# Altium PCB PiggySat-antenna.PcbDoc
Units mil, origin at the board's own origin, x right, y up, seen from the top; angles counter-clockwise.
Board outline 2047.24 x 2047.24 mil, 4 copper layers (Top Layer, Mid Layer 1, Mid Layer 2, Bottom Layer), stack 62.45 mil thick; 30 components, 19 nets, 94 pads, 965 vias.
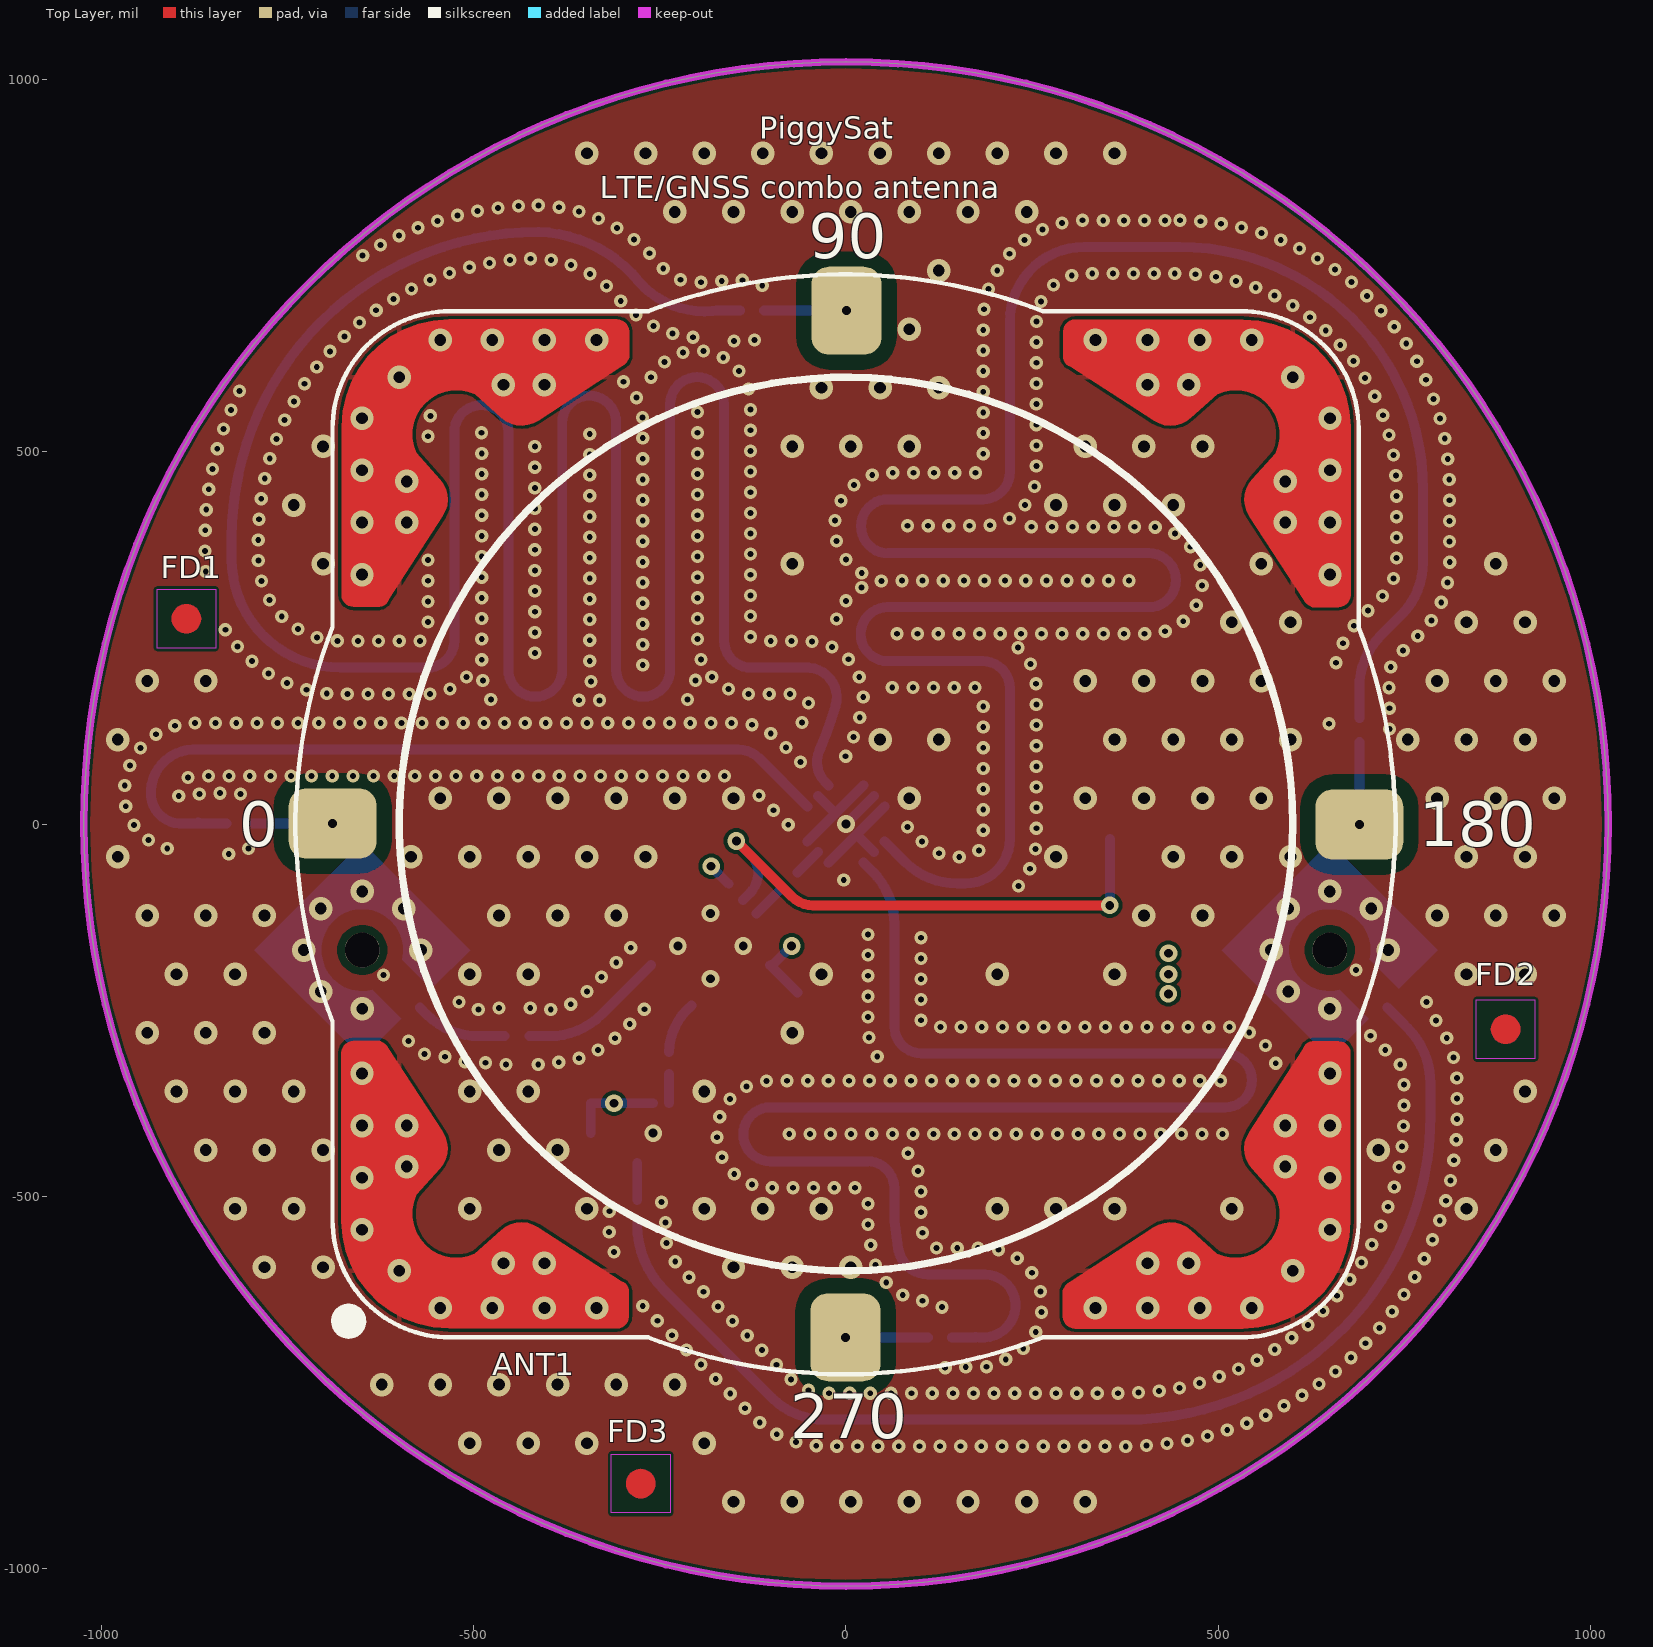
[diagram p0: Top Layer view]
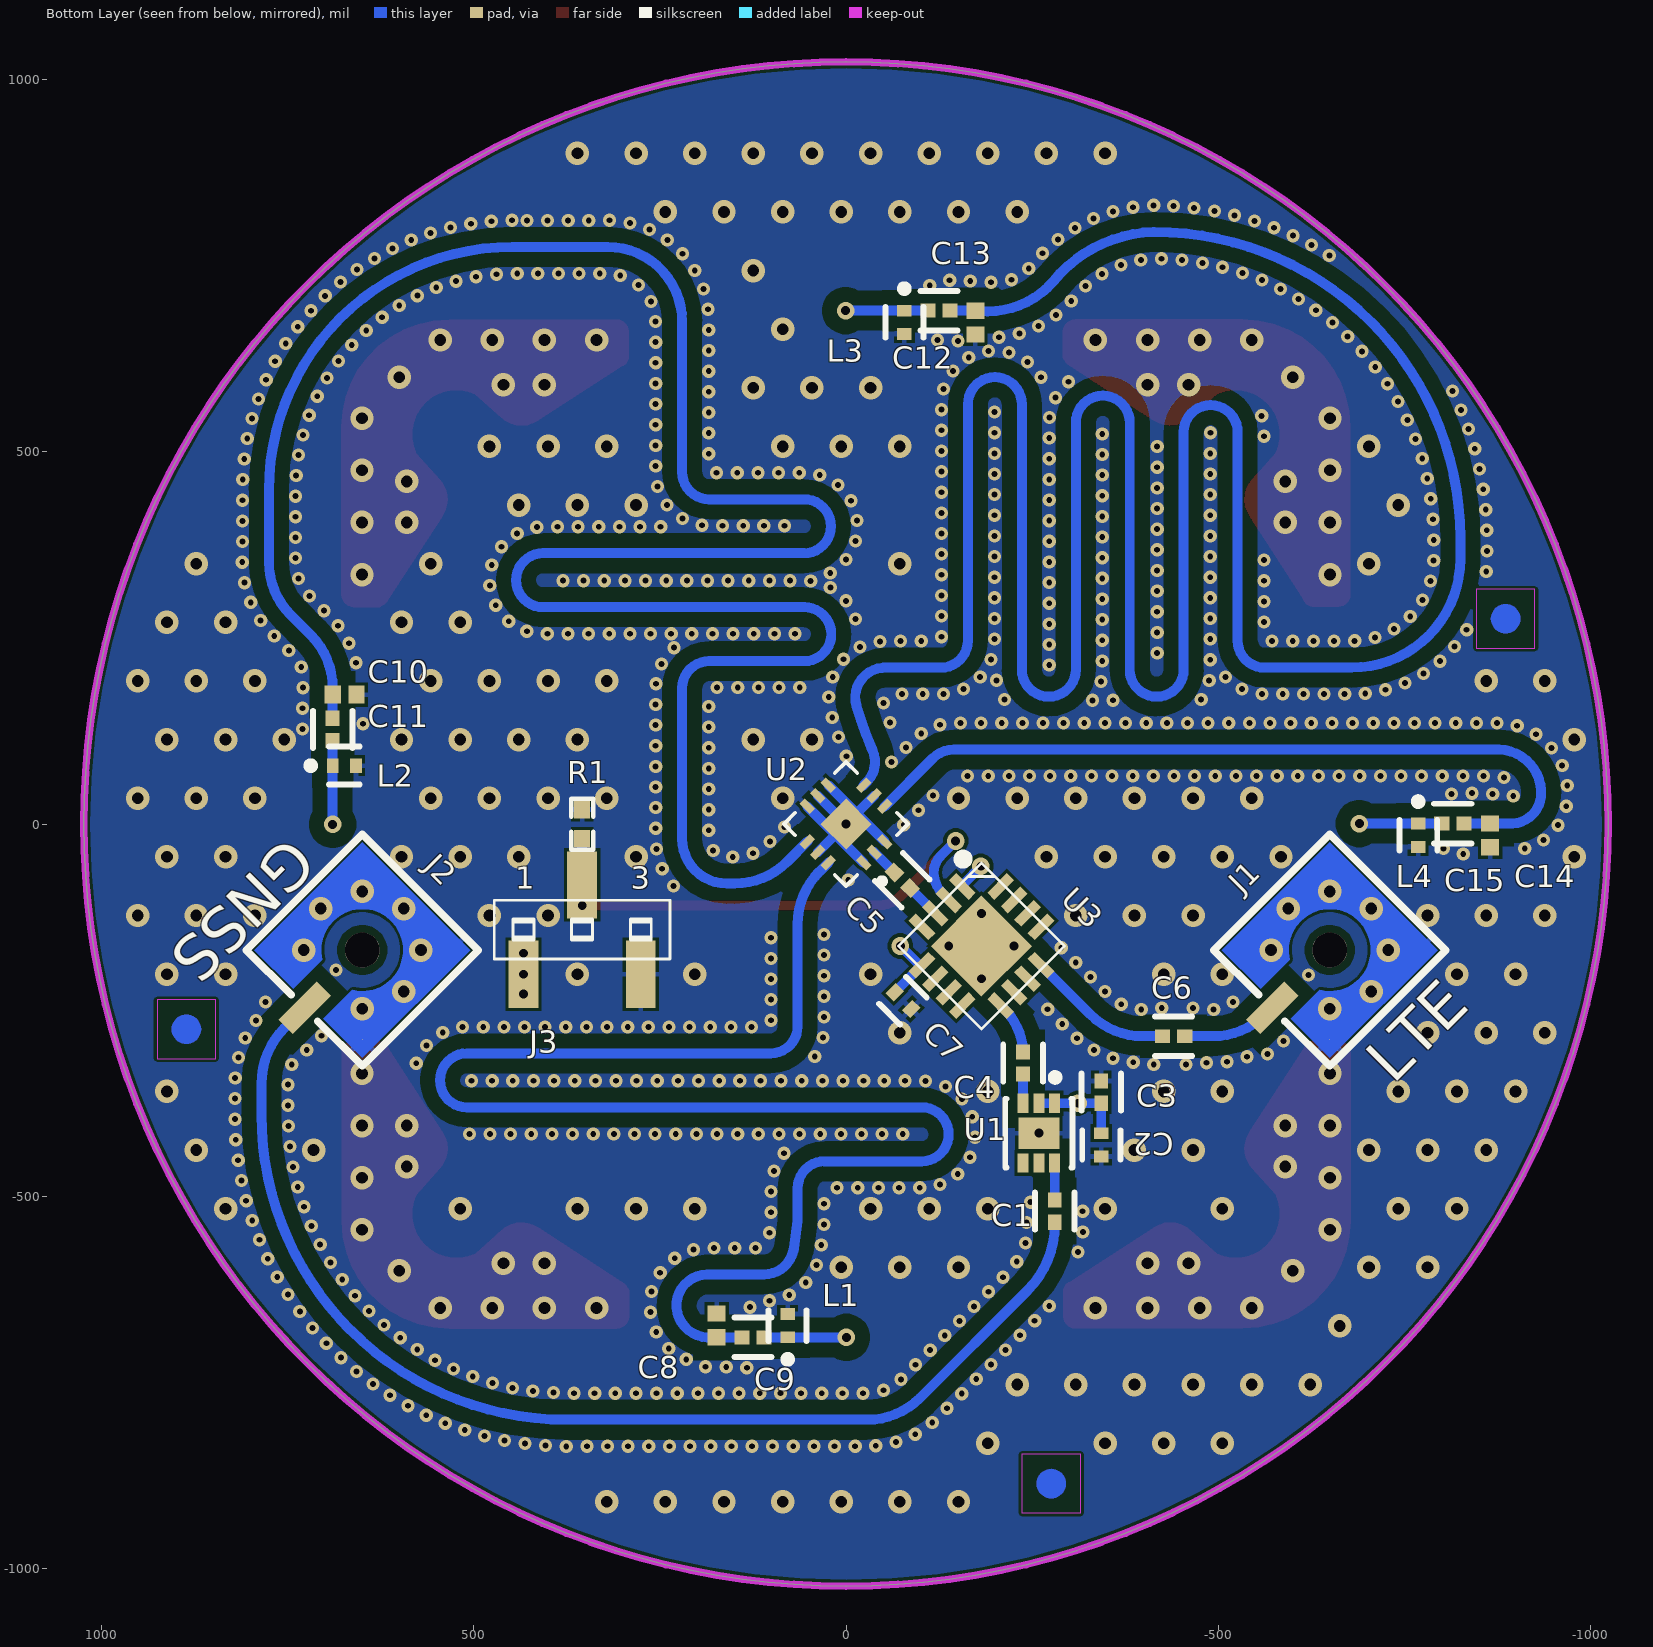
[diagram p1: Bottom Layer view, seen from below]
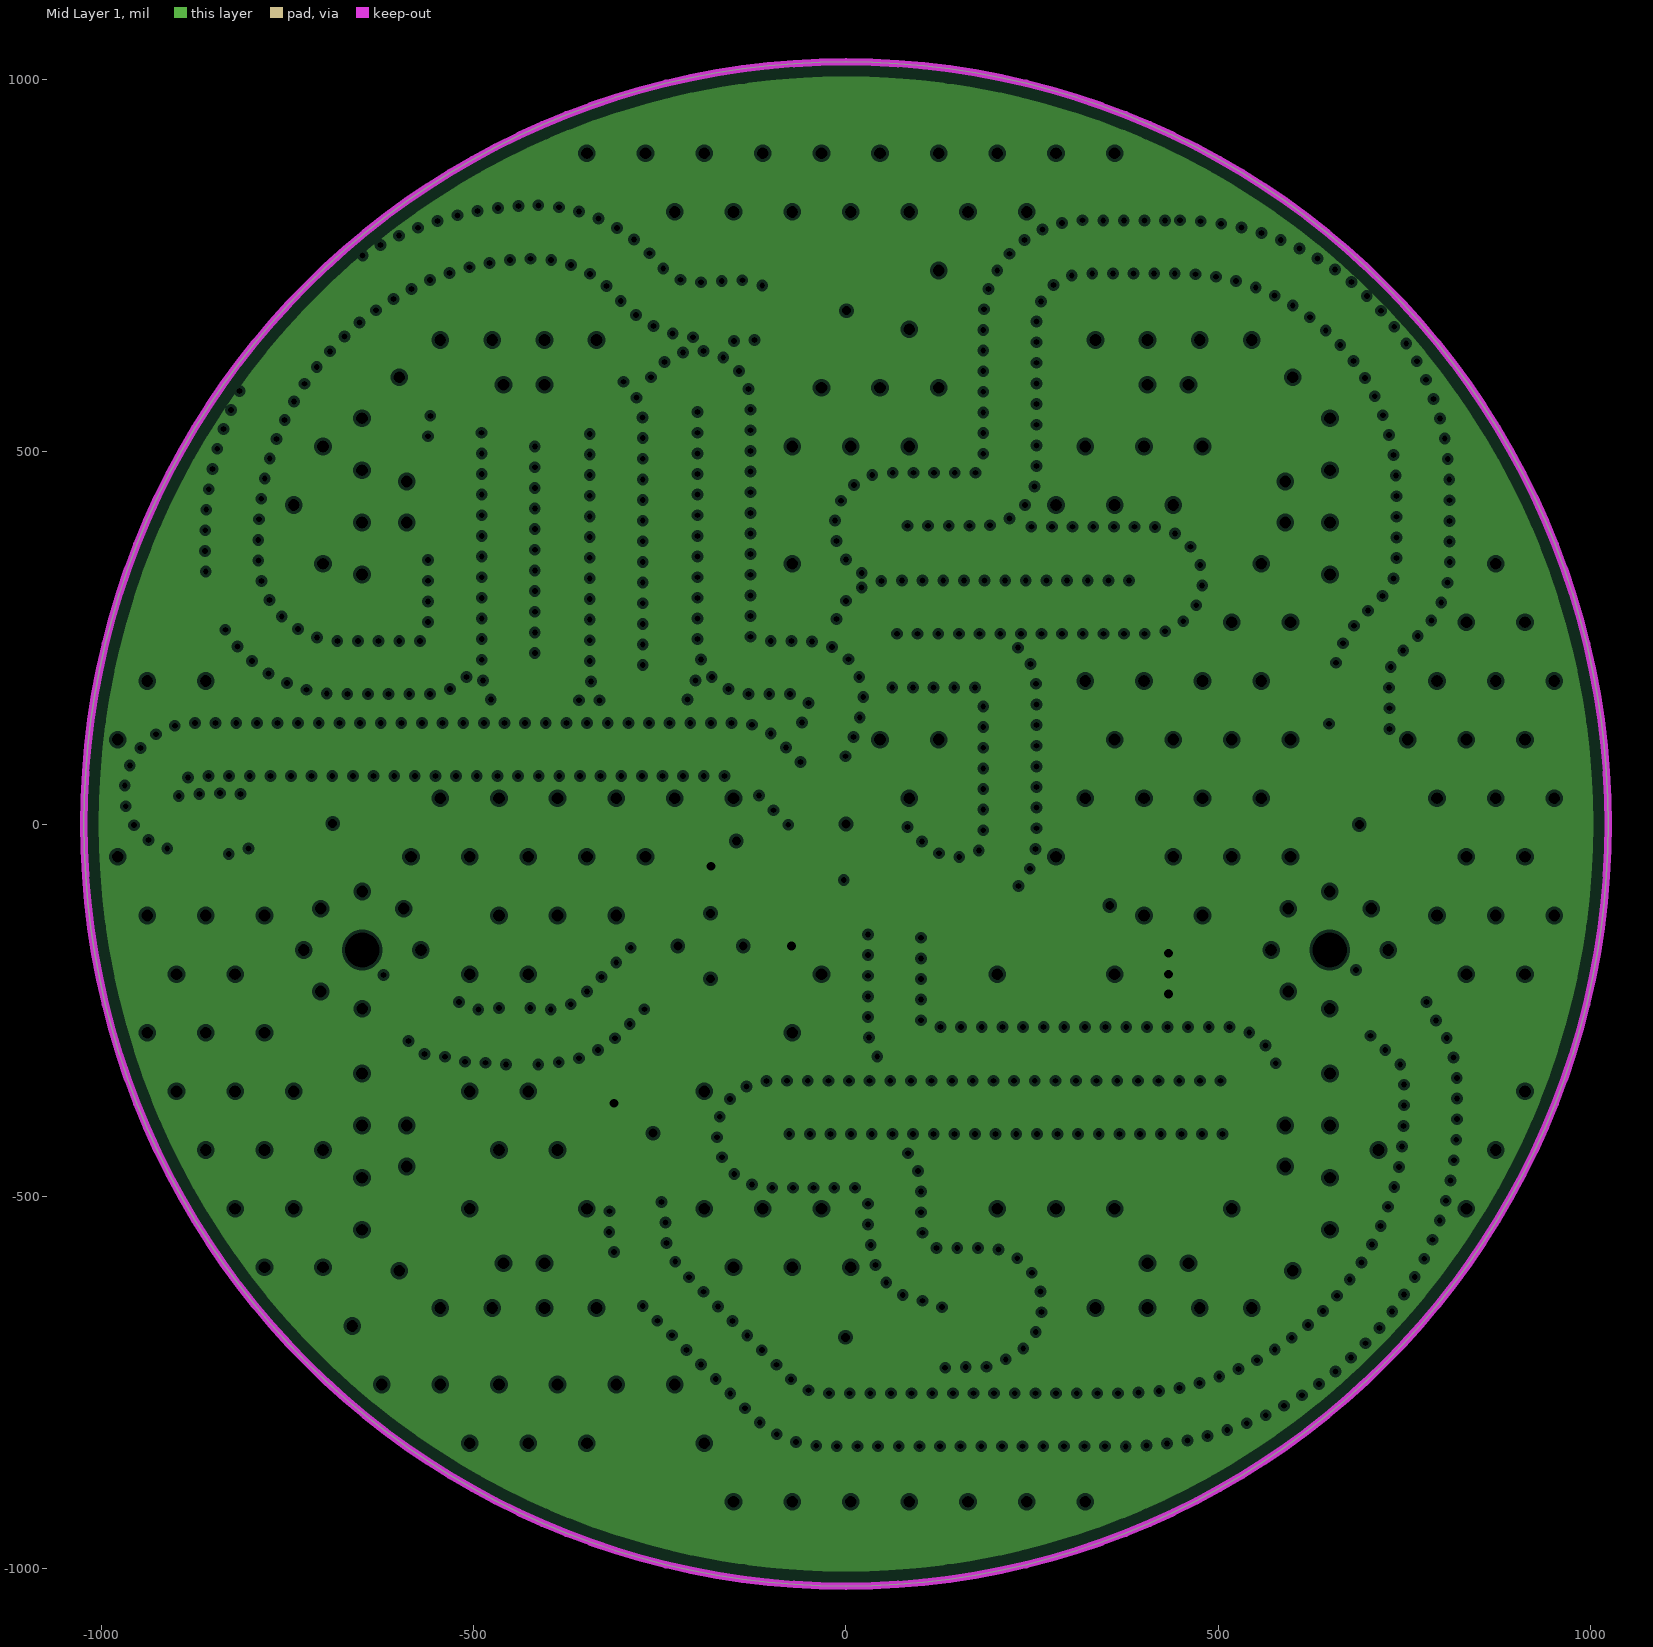
[diagram p2: Mid Layer 1, clearances drawn from the general rule]
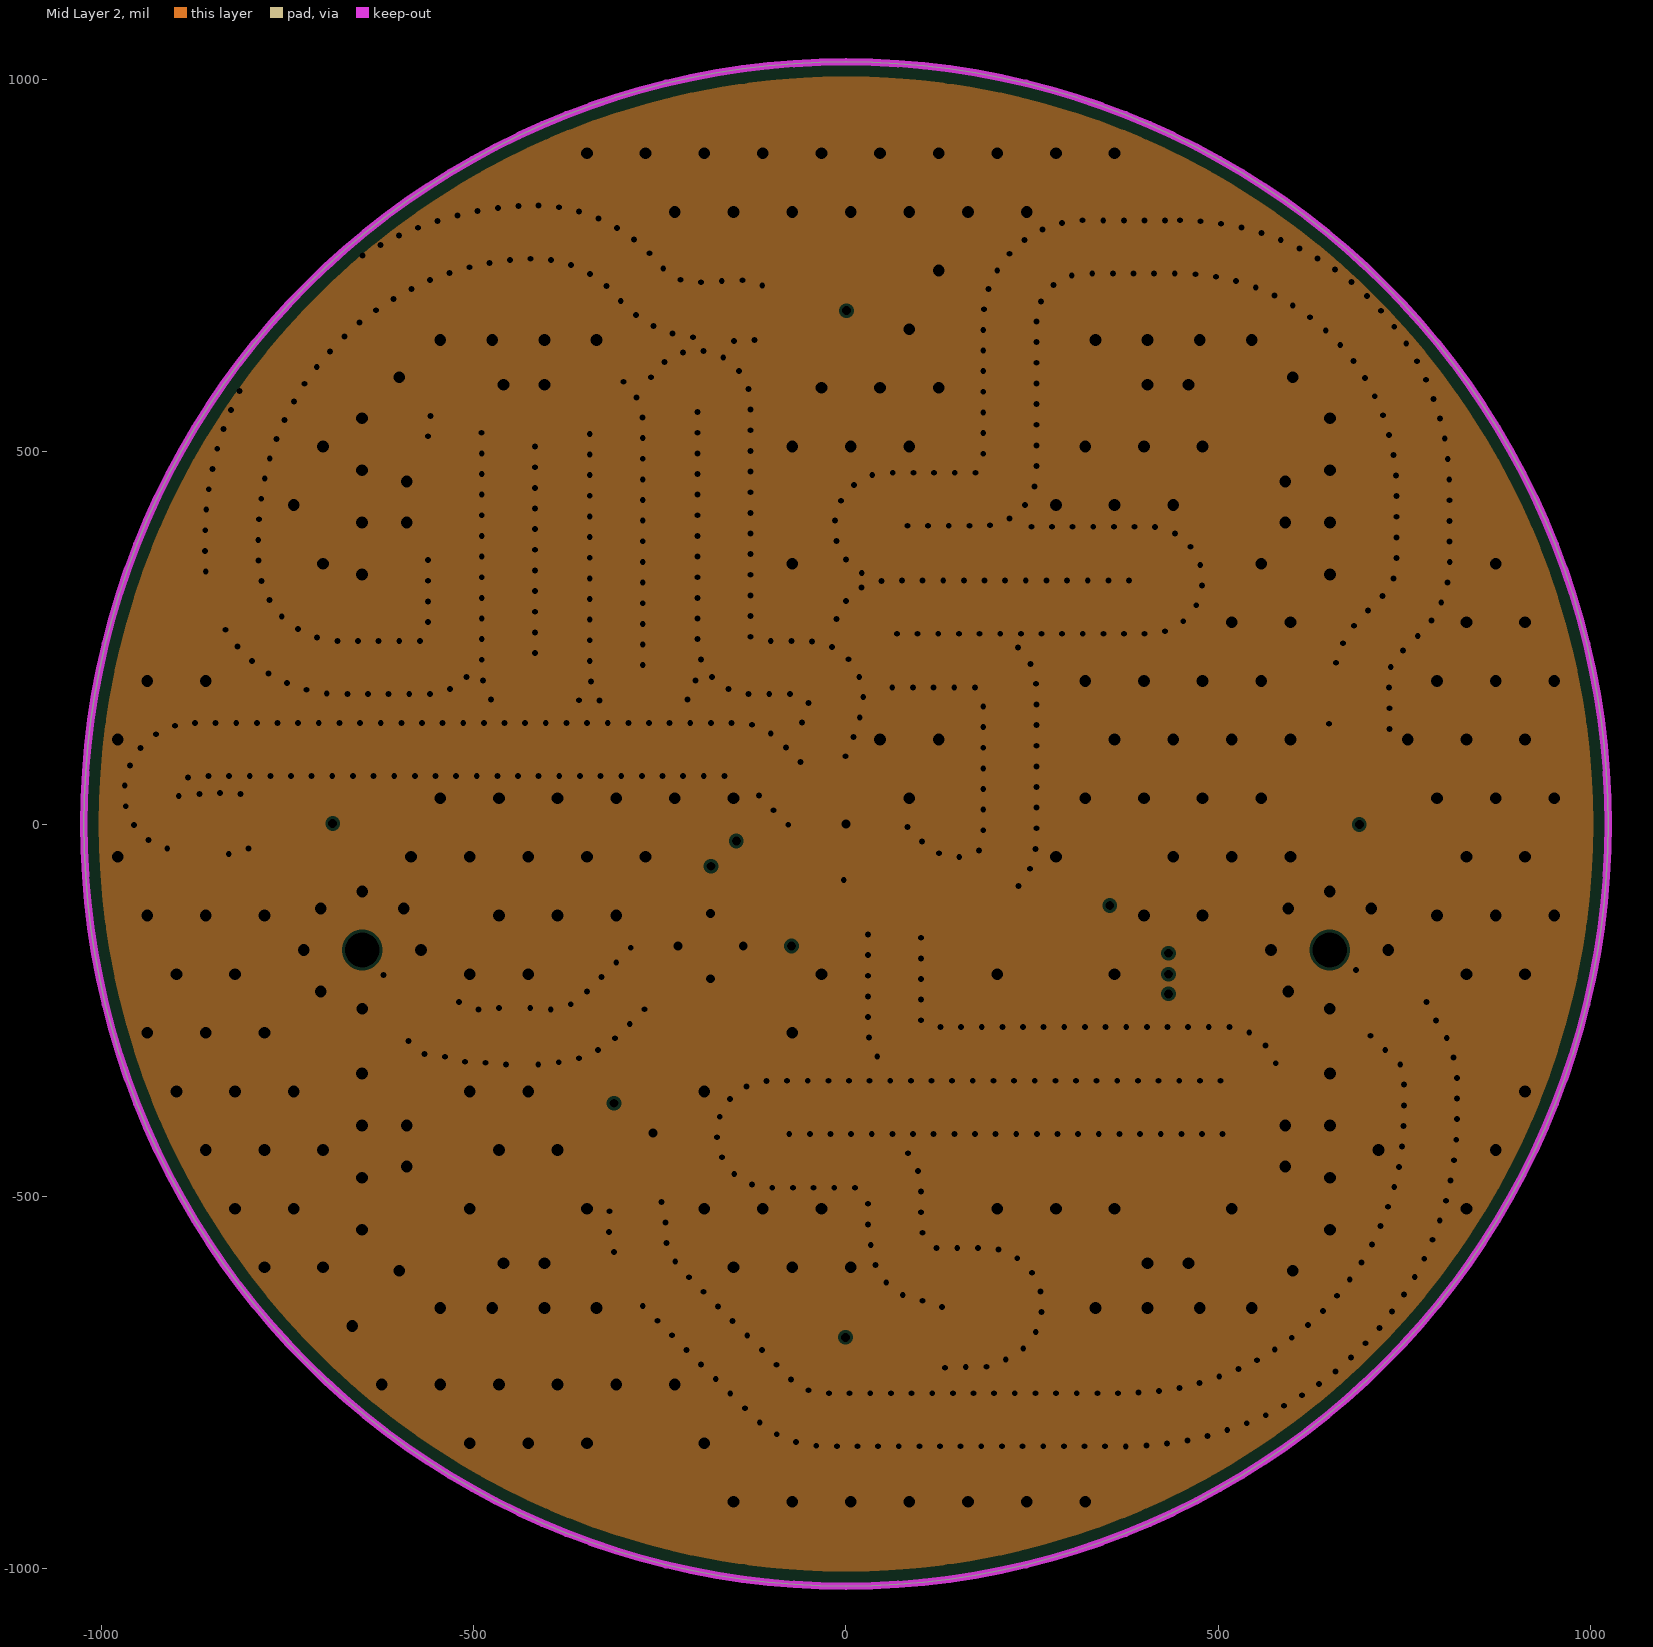
[diagram p3: Mid Layer 2, clearances drawn from the general rule]
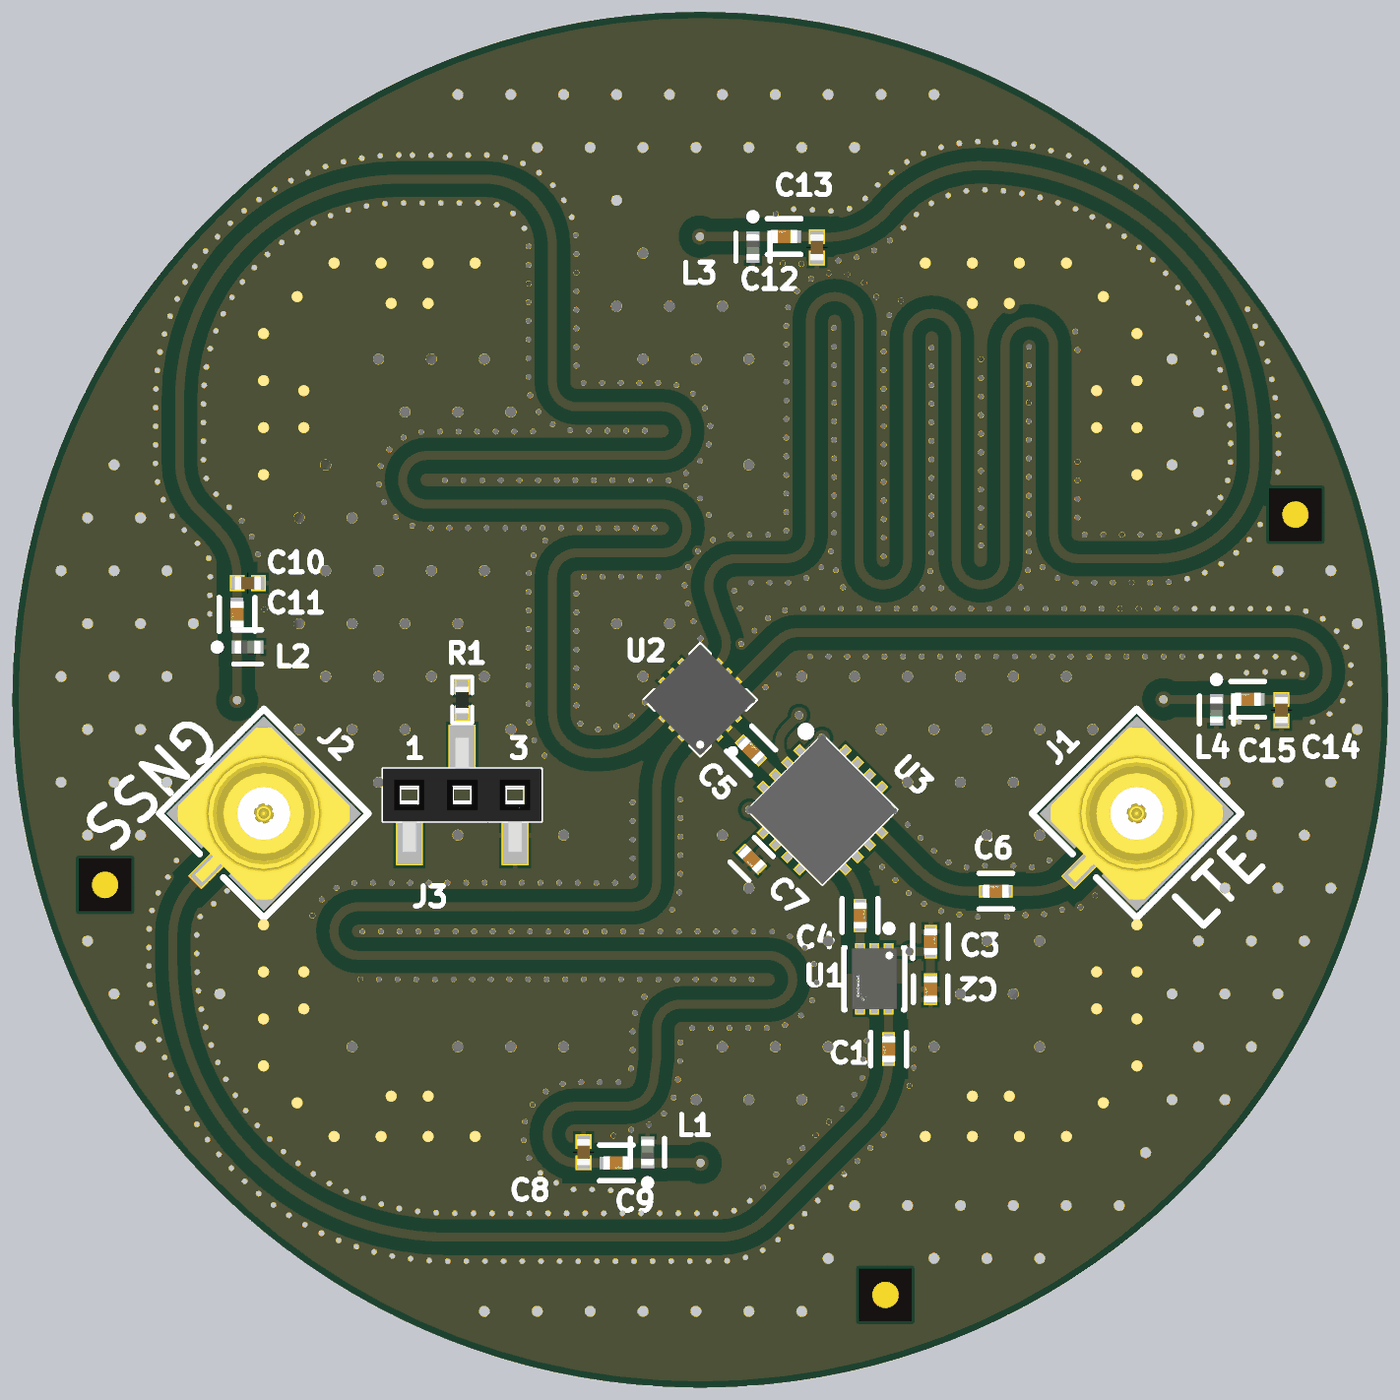
[diagram p4: 3D render of the assembled board from below, using the file's embedded part models]

## Layer stack, top to bottom
Top Solder: solder mask 0.5, Solder Resist, Dk 3.8
Top Layer: signal copper 1.3799
Dielectric 1: prepreg 8.2799, 7628, Dk 4.4
Mid Layer 1: plane copper 0.6, net Vdd
Core: core 41.9299, FR-4, Dk 4.6
Mid Layer 2: plane copper 0.6, net GND
Dielectric 2: prepreg 8.2799, 7628, Dk 4.4
Bottom Layer: signal copper 1.3799
Bottom Solder: solder mask 0.5, Solder Resist, Dk 3.8

## Board outline
-1023.62,0 ccw(c0,0) 0,-1023.62 ccw(c0,0) 1023.62,0 ccw(c0,0) 0,1023.62 ccw(c0,0)

## Design rules (kind name [scope] priority, off if disabled: settings)
BoardOutlineClearance [All] p1: gap=7.87 ignorepadtopadclearanceinfootprint=FALSE
Clearance Clearance_RF [InPoly vs InNetClass('RF')] p1: gap=19.68 ignorepadtopadclearanceinfootprint=FALSE
Clearance [All] p2: gap=4 ignorepadtopadclearanceinfootprint=FALSE except(5: Arc-Via Track-Via SMDPad-Via THPad-Via Via-Via Via-Fill Via-Poly Via-Region Via-Text; 9.84: Arc-Hole Track-Hole SMDPad-Hole THPad-Hole Via-Hole Fill-Hole Poly-Hole Region-Hole Text-Hole)
ComponentClearance [All] p1: gap=4 collisioncheckmode=3 verticalgap=4 showdistances=TRUE
DiffPairsRouting [All] p1: maxlimit=4 minlimit=4 mostfreqgap=4 toplayer_minwidth=4 toplayer_maxwidth=71497.94 toplayer_prefwidth=4 bottomlayer_minwidth=4 bottomlayer_maxwidth=71497.94 bottomlayer_prefwidth=4 maxuncoupledlength=500
Height [All] p1: minheight=0 maxheight=71497.94 prefheight=500
HoleSize [All] p1: absolutevalues=TRUE maxlimit=248.03 minlimit=7.87 maxpercent=80.000 minpercent=20.000
HoleToHoleClearance [All] p1: gap=9.84 allowstackedmicrovias=FALSE
Length Length_0 [InNet('0DEG')] p1: maxlimit=100000 minlimit=0 usedelayunits=TRUE mindelay=155.000000 maxdelay=165.000000
Length Length_270 [InNet('270DEG')] p2: maxlimit=100000 minlimit=0 usedelayunits=TRUE mindelay=315.000000 maxdelay=325.000000
Length Length_180 [InNet('180DEG')] p3: maxlimit=100000 minlimit=0 usedelayunits=TRUE mindelay=475.000000 maxdelay=485.000000
Length Length_90 [InNet('90DEG')] p4: maxlimit=100000 minlimit=0 usedelayunits=TRUE mindelay=635.000000 maxdelay=645.000000
MinimumAnnularRing [All] p1: minimumring=3
MinimumSolderMaskSliver [All] p1: minsoldermaskwidth=0
PasteMaskExpansion [All] p1: expansion=-2
PlaneClearance [All] p1: clearance=4
PlaneConnect [All] p1: pad.planeconnectstyle=Relief pad.reliefexpansion=11.81 pad.reliefentries=4 pad.reliefconductorwidth=7 pad.reliefairgap=4 via.planeconnectstyle=Direct via.reliefexpansion=11.81 via.reliefentries=4 via.reliefconductorwidth=5 via.reliefairgap=5
PolygonConnect [All] p1: thpad.connectstyle=Relief thpad.reliefconductorwidth=7 thpad.reliefentries=4 thpad.polygonreliefangle="90 Angle" thpad.airgapwidth=4 smdpad.connectstyle=Relief smdpad.reliefconductorwidth=7 smdpad.reliefentries=4 smdpad.polygonreliefangle="90 Angle" smdpad.airgapwidth=4 via.connectstyle=Direct via.reliefconductorwidth=5 via.reliefentries=4 via.polygonreliefangle="90 Angle" via.airgapwidth=5
RoutingVias [All] p1: holewidth=7.87 width=17.72 viastyle="Through Hole" minholewidth=7.87 minwidth=17.72 maxholewidth=248.03 maxwidth=257.87
SilkToSilkClearance [All] p1: silktosilkclearance=0
SilkToSolderMaskClearance [IsPad] p1: minsilkscreentomaskgap=4 clearancetoexposedcopper=TRUE
SolderMaskExpansion SolderMaskExpansion_VIA [IsVia] p1: expansion=0 istentingtop=TRUE
SolderMaskExpansion [All] p2: expansion=0 istentingtop=FALSE
SupplyNets "Schematic Supply Nets_2" [InNet('Vdd')] p1: voltage=0.000
SupplyNets "Schematic Supply Nets" [InNet('GND')] p2: voltage=0.000
Width Width_RF [InNetClass('RF')] p1: maxlimit=13.78 minlimit=12.99 preferedwidth=13.41 impedanceprofiledriven=TRUE impedanceprofileid={44AED5FC-8F72-452D-84E0-EAAEBCFB1EA8} impedanceprofilevalue=50.000000 minimp=50.000000 maximp=50.000000 favimp=50.000000
Width [All] p2: maxlimit=71497.94 minlimit=4 preferedwidth=4
19 further rules are at their usual default settings.

## Classes and differential pairs
net class RF: 0DEG 90DEG 180DEG 270DEG GNSS LTE NetANT1_2 NetANT1_4 NetANT1_6 NetANT1_8 NetC1_1 NetC4_1 NetC4_2 NetC5_1 NetC5_2 NetC6_2

## Components (designator, comment, footprint, x,y, rotation, side; value= is the part's Value field where it differs from the comment)
ANT1 "9002418L0-L16L" 9002418L0-L16L-Footprint-1 0,0 r90 top locked
C1 "GCM1555C1H101JA16D" FP-GCM155-0_05-IPC_C -280.33,-519.9 r270 bottom
C2 "GRM155R71C104KA88J" FP-GRM155-0_05-MFG -342.81,-430.91 r270 bottom
C3 "GCM1555C1H101JA16D" FP-GCM155-0_05-IPC_C -342.81,-360.1 r90 bottom
C4 "GCM1555C1H101JA16D" FP-GCM155-0_05-IPC_C -237.81,-321.06 r90 bottom
C5 "GCM1555C1H101JA16D" FP-GCM155-0_05-IPC_C -75.54,-75.54 r45 bottom
C6 "GCM1555C1H101JA16D" FP-GCM155-0_05-IPC_C -440,-285 r0 bottom
C7 "GRM155R71C104KA88J" FP-GRM155-0_05-MFG -76.49,-237.28 r225 bottom
C8 "C 0402" cap_0402 173.66,-673.4 r180 bottom
C9 "GJM1555C1H2R2BB01D" FP-GJM155-0_05-IPC_C 124.9,-689.4 r180 bottom
C10 "C 0402" cap_0402 673.4,173.66 r270 bottom
C11 "GJM1555C1H2R2BB01D" FP-GJM155-0_05-IPC_C 689.4,127.1 r270 bottom
C12 "C 0402" cap_0402 -173.66,673.4 r0 bottom
C13 "GJM1555C1H2R2BB01D" FP-GJM155-0_05-IPC_C -124.9,689.4 r0 bottom
C14 "C 0402" cap_0402 -865,-15.4 r0 bottom
C15 "GJM1555C1H2R2BB01D" FP-GJM155-0_05-IPC_C -814.9,0.6 r0 bottom
FD1 "Fiducial_1mm" Fiducial_1mm-Footprint-1 -885.83,275.59 r0 top locked
FD2 "Fiducial_1mm" Fiducial_1mm-Footprint-1 885.83,-275.59 r90 top locked
FD3 "Fiducial_1mm" Fiducial_1mm-Footprint-1 -275.59,-885.83 r90 top locked
J1 "85305-0232" MOLEX_85305-0232 -649.61,-169.29 r225 bottom locked
J2 "85305-0232" MOLEX_85305-0232 649.61,-169.29 r225 bottom locked
J3 "SMM-103-02-S-S" SMM-103-02-SM-S 354.33,-141.73 r180 bottom locked
L1 "LQG15HZ6N8J02D" FP-LQG15HH_02-MFG 78.34,-673.65 r90 bottom
L2 "LQG15HZ6N8J02D" FP-LQG15HH_02-MFG 673.65,78.34 r180 bottom
L3 "LQG15HZ6N8J02D" FP-LQG15HH_02-MFG -78.34,673.65 r270 bottom
L4 "LQG15HZ6N8J02D" FP-LQG15HH_02-MFG -768.34,-15.15 r270 bottom
R1 "10k" RESC1005X04L 354.33,-0.31 r270 bottom
U1 "SKY65723-81" FP-SKY65723-81-MFG -259.07,-415.16 r270 bottom
U2 "WP4GA+" WP4_12QFN 0,0 r45 bottom locked
U3 "RFSW6024TR13" QFN65P400X400X90-17N -181.94,-163.85 r225 bottom locked

## Footprints (in the part's own frame and the unit in brackets; to place one, negate y for a bottom-side part, rotate by r counter-clockwise, add the part's x,y. Pads: shape width x height; smd on the part's side, far side on the other; paste and mask are expansions set on the pad)
9002418L0-L16L-Footprint-1 [mil]
  round 1 smd: 1(-600,600) 3(600,600) 5(600,-600) 7(-600,-600)
  rrect50% 94.49x118.11 smd: 2(0.6,689.4) 6(-0.6,-689.4)
  rrect50% 118.11x94.49 smd: 4(689.4,-0.6) 8(-689.4,0.6)
  silkscreen extent -741,-740 740,741, body extent -739,-739 739,739, height 712
cap_0402 [mil]
  rect 24x22 smd: 1(0,16) 2(0,-16)
  body extent -10,-20 10,20, height 20
Fiducial_1mm-Footprint-1 [mil]
  Top Layer region: 0,-19.68 -7.53,-18.19 -13.92,-13.92 -18.19,-7.53 -19.68,0 -19.69,0 -18.19,7.53 -13.92,13.92 -7.53,18.19 0,19.68 0,19.68 7.53,18.19 13.92,13.92 18.19,7.53 19.68,0 19.68,0 18.19,-7.53 13.92,-13.92 7.53,-18.19 0,-19.68
  Top Layer keep-out region: -39.37,-39.37 -39.37,39.37 39.37,39.37 39.37,-39.37
  Bottom Layer region: 0,-19.68 -7.53,-18.19 -13.92,-13.92 -18.19,-7.53 -19.68,0 -19.69,0 -18.19,7.53 -13.92,13.92 -7.53,18.19 0,19.68 0,19.68 7.53,18.19 13.92,13.92 18.19,7.53 19.68,0 19.68,0 18.19,-7.53 13.92,-13.92 7.53,-18.19 0,-19.68
  Bottom Layer keep-out region: -39.37,-39.37 -39.37,39.37 39.37,39.37 39.37,-39.37
FP-GCM155-0_05-IPC_C [mil]
  rect 20.29x18.6 smd: 1(-14.9,0) 2(14.9,0)
  silkscreen extent -25,-27 25,27, body extent -20,-10 20,10, height 22
FP-GJM155-0_05-IPC_C [mil]
  rect 20.29x18.6 smd paste+0 mask+0: 1(-14.9,0) 2(14.9,0)
  silkscreen extent -25,-27 25,27, body extent -20,-10 20,10, height 22
FP-GRM155-0_05-MFG [mm]
  rect 0.4x0.5 smd: 1(-0.4,0) 2(0.4,0)
  silkscreen extent -0.5,-0.65 0.5,0.65, body extent -0.5,-0.25 0.5,0.25, height 0.55
FP-LQG15HH_02-MFG [mm]
  rect 0.4x0.5 smd paste+0 mask+0: 1(-0.4,0) 2(0.4,0)
  silkscreen extent -1.27,-0.64 0.53,0.65, body extent -0.5,-0.25 0.5,0.25, height 0.55
FP-SKY65723-81-MFG [mm]
  rect 0.66x0.375 smd: 1(-1.02,0.54) 2(-1.02,0) 3(-1.02,-0.54) 4(1.02,-0.54) 5(1.02,0) 6(1.02,0.54)
  rect 1.08x1.4 smd: 7(0,0)
  silkscreen extent -2.02,-1.15 1.17,1.15, body extent -1.15,-0.85 1.15,0.85, height 0.8
MOLEX_85305-0232 [mm]
  rect 0.7x1.85 smd: 1(0,-2.775)
  round 0.025 smd: 2(2.159,-2.159)
  round 1.19 hole 1.19 unplated: ""(0,0)
  silkscreen extent -2.79,-2.79 2.79,2.79, body extent -2.5,-3.47 2.5,2.5, height 4.09
QFN65P400X400X90-17N [mm]
  rect 0.95x0.35 smd: 1(-1.9,0.975) 2(-1.9,0.325) 3(-1.9,-0.325) 4(-1.9,-0.975) 9(1.9,-0.975) 10(1.9,-0.325) 11(1.9,0.325) 12(1.9,0.975)
  rect 0.35x0.95 smd: 5(-0.975,-1.9) 6(-0.325,-1.9) 7(0.325,-1.9) 8(0.975,-1.9) 13(0.975,1.9) 14(0.325,1.9) 15(-0.325,1.9) 16(-0.975,1.9)
  rect 2.45x2.45 smd: 17(0,0)
  silkscreen extent -2.7,-2 2,2, body extent -2.05,-2.05 2.05,2.05, height 0.9
RESC1005X04L [mm]
  rect 0.6x0.55 smd: 1(-0.5,0) 2(0.5,0)
  silkscreen extent -0.87,-0.38 0.88,0.38, body extent -0.5,-0.25 0.5,0.25, height 0.3
SMM-103-02-SM-S [mil] "SMM Series 2.00 mm Tiger Eye™ High-Reliability Socket Strip"
  rect 40.16x90.16 smd: 1(-78.74,-60) 2(0,60) 3(78.74,-60)
  silkscreen extent -118,-39 118,39, body extent -118,-85 118,85, height 146
WP4_12QFN [mil]
  rect 20x10 smd: 1(-53.5,20) 2(-53.5,0) 3(-53.5,-20) 7(53.5,-20) 8(53.5,0) 9(53.5,20)
  rect 10x20 smd: 4(-20,-53.5) 5(0,-53.5) 6(20,-53.5) 10(20,53.5) 11(0,53.5) 12(-20,53.5)
  rect 49x49 smd: 13(0,0)
  silkscreen extent -93,-59 59,59, body extent -59,-59 59,59, height 35

## Part data
ANT1: "Internal Antenna, L-Band, Cap/1.7/1.6Dbi Rohs Compliant: Yes", Introduction Date=2025-04-03, Lifecycle Status=Production, REACH SVHC=Yes, RoHS=Compliant
C1 C3 C4 C5 C6: library part CMP-2008-03694-3, "Ceramic Capacitor for Automotive 100pF ±5% 50VDC C0G 0402 Paper T/R", Capacitance=100pF, Case Code (Imperial)=0402, Case Code (Metric)=1005, Dielectric=C0G, Max Operating Temperature=125°C, Min Operating Temperature=-55°C, Package Quantity=10000, Ratings=AEC-Q200, Tolerance=5%, Voltage=50V, Case/Package=0402, Depth=0.5mm, Height=0.5mm, Lead Free="Lead Free", Length=1mm, Mount="Surface Mount", Packaging="Tape and Reel", Radiation Hardening=No, REACH SVHC="No SVHC", Termination=SMD/SMT, Thickness=0.022inch, Voltage Rating=50V, Voltage Rating (DC)=50V, Weight=0.000212oz, Width=0.02inch
C2 C7: library part CMP-2008-03928-2, "Multilayer Ceramic Capacitors MLCC - SMD/SMT 0.1 uF 16 VDC 10% 0402 X7R", Capacitance=100nF, Case Code (Imperial)=0402, Case Code (Metric)=1005, Dielectric=X7R, Manufacturer Lifecycle Status=NRND, Max Operating Temperature=125°C, Min Operating Temperature=-55°C, Tolerance=10%, Voltage=16V, Case/Package=0402, Depth=500µm, Height=550µm, Lead Free="Lead Free", Length=1mm, Material=Ceramic, Mount="Surface Mount", NexarPartId=9223238, Number of Pins=2, Packaging="Cut Tape", Radiation Hardening=No, REACH SVHC="No SVHC", RoHS=Compliant, Schedule B="8532240020, 8532240020", Termination=SMD/SMT, Thickness=500µm, Voltage Rating=16V, Voltage Rating (DC)=16V, Width=500µm
C8 C10 C12 C14: library part CAP_0402
C9 C11 C13 C15: library part CMP-2008-03835-2, "Multi-Layer Ceramic Capacitor 2.2pF C0G  ±0.1pF 0402 Paper T/R", Capacitance=2.2pF, Case Code (Imperial)=0402, Case Code (Metric)=1005, Dielectric=C0G, Max Operating Temperature=125°C, Min Operating Temperature=-55°C, Package Quantity=10000, Temperature Coefficient=30ppm/°C, Voltage=50V, Case/Package=0402, Depth=0.5mm, Height=0.5mm, Lead Free="Lead Free", Lead Pitch=0.3mm, Length=1mm, Mount="Surface Mount", Number of Pins=2, Packaging="Tape and Reel", Radiation Hardening=No, REACH SVHC="No SVHC", Termination=SMD/SMT, Thickness=0.022inch, Voltage Rating=50V, Voltage Rating (DC)=50V, Width=0.5mm
FD1 FD2 FD3: library part CMP-00017-7, "1mm fiducial marker"
J1 J2: "Circular Connector, SMP STRAIGHT PLUG, PCB, 85305 SMP RF Connectors Series", Manufacturer=MOLEX, ComponentLink1Description="Manufacturer URL", ComponentLink1URL=http://www.rosenberger.de, ComponentLink2Description=Datasheet, ComponentLink2URL=http://rosenberger.de/ok/images/documents/db/32K145-400L5.pdf, ComponentLink3Description="Package Specification", ComponentLink3URL=http://rosenberger.de/ok/images/documents/db/32K145-400L5.pdf, ComponentLink4Description="Series Overview / Design Note", ComponentLink4URL=http://rosenberger.de/ok/images/documents/spez/32.pdf, ComponentLink5Description="Webshop / RFQ", ComponentLink5URL=http://www.rosenberger.com/en/contact/sales/, Mounting Technology="Surface Mount", System=Connector
J3: library part SMM-103-02-SM-S, "SMM Series 2.00 mm Tiger Eye™ High-Reliability Socket Strip", System=Connector
L1 L2 L3 L4: library part CMP-06042-011185-1, "Multilayer type Inductor for Automotive 6.8nH ±5% 0.22Ω 600mA 0402", Case/Package=0402, Current Rating=600mA, DC Resistance (DCR)=220mR, Inductance=6.8nH, Max Operating Temperature=125°C, Min Operating Temperature=-55°C, Ratings=AEC-Q200, Self Resonant Frequency=4.5GHz, Test Frequency=100MHz, Tolerance=5%, Core Material=Air, Mount="Surface Mount", Packaging="Tape and Reel", Shielding=Unshielded
R1: library part CMP-009-00001-2, "Res 10k 0402"
U1: library part CMP-85924-000002-1, "IC RF AMP LNA GPS/GNSS SPFS", RoHS Compliant=Yes
U2: "4 Ways MMIC Power Splitter, 1420 - 1660 MHz, 50Ω", Package="VQFN-12 Mini-Circuits", Check_prices=https://www.snapeda.com/parts/WP4G1+/Mini-Circuits/view-part/?ref=eda, MF=Mini-Circuits, MP=WP4G1+, SnapEDA_Link=https://www.snapeda.com/parts/WP4G1+/Mini-Circuits/view-part/?ref=snap
U3: "5 - 6000 MHz Absorptive High Isolation SPDT Switch", Manufacturer_Name=Qorvo, Mouser Part Number=772-RFSW6024TR13, Datasheet Link=https://www.qorvo.com/products/d/da001155, Geometry.Height=0.9mm, Manufacturer_Part_Number=RFSW6024TR13, Mouser Price/Stock=https://www.mouser.co.uk/ProductDetail/Qorvo/RFSW6024TR13?qs=u4fy%2FsgLU9NLk9lDlNNCYg%3D%3D

## Via types
v1: diameter 17.72, hole 7.87, Top Layer to Bottom Layer, tented both sides, 722 vias
v2: diameter 31.5, hole 15.75, Top Layer to Bottom Layer, tented both sides, 225 vias
v3: diameter 23.62, hole 11.81, Top Layer to Bottom Layer, tented both sides, 18 vias

## Nets (pads, with @x,y where several pads share a name; then routed paths per layer and width w, separated by ;. In a path a pad name is that pad's centre, name@x,y a point inside that pad or via, vN(x,y) a via of type N, cw(c..) or ccw(c..) an arc to the next point about the centre after c; other vN are vias at no path point)
0DEG: C14.2 C15.1 U2.4 | length 1075.7
  Bottom Layer w13.39: C14.2@-870.31,2.06 C14.2 ; C15.1@-832,0.6 C14.2 ; -116.53,88.25 ccw(c-144.92,59.84) -144.91,100 -876.2,100 ccw(c-876.2,59.84) -877.23,99.99 ccw(c-875.65,42.15) -933.3,37.3 ccw(c-893.29,40.72) -895,0.6 C14.2 ; -116.52,88.24 U2.4
90DEG: C12.2 C13.1 U2.6 | length 4208.2
  Bottom Layer w13.39: -412.96,794.99 ccw(c-414.1,754.85) -413.1,795 -413.54,795.01 ccw(c-413.99,384) -825,384 -825,355.96 ccw(c-679.04,355.96) -679.12,210 -672.43,210 -562.14,210 ccw(c-562.14,246.22) -525.92,246.22 -525.92,526.34 cw(c-489.7,526.34) -489.7,562.56 cw(c-489.7,526.34) -453.48,526.34 -453.48,207.29 ccw(c-417.26,207.29) -417.26,171.07 ccw(c-417.26,207.29) -381.04,207.29 -381.04,538.93 cw(c-344.82,538.93) -344.82,575.15 cw(c-344.82,538.93) -308.6,538.93 -308.6,207.29 ccw(c-272.38,207.29) -272.38,171.07 ccw(c-272.38,207.29) -236.16,207.29 -236.16,563.82 cw(c-199.94,563.82) -199.94,600.04 cw(c-199.94,563.82) -163.72,563.82 -163.72,246.22 ccw(c-127.5,246.22) -127.5,210 -55.06,210 -52.42,210 cw(c-52.54,169.84) -48.36,209.78 cw(c-52.54,169.84) -13.95,158.73 cw(c-463.09,288.66) -35.41,99.73 ccw(c1.29,83.42) U2.6 ; -412.92,794.99 cw(c-418.25,614.12) -278.74,729.35 ccw(c-192.81,800.83) -233.64,696.79 ccw(c-189.28,809.82) -178.97,688.83 C12.2 C13.1@-142,689.4
180DEG: C10.2 C11.1 U2.10 | length 3169.8
  Bottom Layer w13.39: U2.10 79,-50.71 ccw(c149.71,20) 149.71,-80 160,-80 ccw(c160,-20) 220,-20 220,175.82 220,182.52 ccw(c183.78,182.52) 183.78,218.74 56.03,218.74 cw(c56.03,254.96) 19.81,254.96 cw(c56.03,254.96) 56.03,291.18 406.91,291.18 ccw(c406.91,327.4) 443.13,327.4 ccw(c406.91,327.4) 406.91,363.62 56.37,363.62 cw(c56.37,399.84) 20.15,399.84 cw(c56.37,399.84) 56.37,436.06 183.78,436.06 ccw(c183.78,472.28) 220,472.28 220,581.37 220,675 cw(c320,675) 320,775 447.91,775 cw(c447.91,447.91) 775,447.91 775,351.42 cw(c675,351.42) 745.71,280.71 718.69,253.69 ccw(c789.4,182.98) 689.4,182.98 C10.2 C11.1
270DEG: C8.2 C9.1 U2.12 | length 2113.2
  Bottom Layer w13.39: U2.12 35.71,-63.99 cw(c-35,-134.71) 65,-134.71 65,-265.14 65,-271.83 ccw(c101.22,-271.83) 101.22,-308.05 509.04,-308.05 cw(c509.04,-344.27) 545.26,-344.27 cw(c509.04,-344.27) 509.04,-380.49 -101.63,-380.49 ccw(c-101.63,-416.71) -137.85,-416.71 ccw(c-101.63,-416.71) -101.63,-452.93 28.78,-452.93 cw(c28.78,-489.15) 65,-489.15 65,-533.58 69.61,-569.07 ccw(c204,-533.58) 71.56,-575.77 ccw(c204,-533.58) 71.72,-576.27 ccw(c204,-533.58) 72.14,-577.54 72.18,-577.68 ccw(c110.23,-564.84) 75.5,-585 ccw(c110.23,-564.84) 110.23,-605 128.97,-605 186.21,-605 cw(c186.09,-645.16) 186.55,-605 cw(c186.05,-646.64) 221.35,-668.72 cw(c187.31,-647.41) 221.26,-668.86 cw(c183.55,-645.02) 178.97,-689.4 C8.2@173.82,-688.56 ; C9.1@142,-689.4 C8.2
GND: ANT1.1 ANT1.3 ANT1.5 ANT1.7 C2.2 C3.2 C7.2 C8.1 C10.1 C12.1 C14.1 J1.2 J2.2 J3.3 L1.2 L2.2 L3.2 L4.2 R1.1 U1.7 U2.1 U2.3 U2.5 U2.7 U2.8 U2.9 U2.11 U2.13 U3.17 | length 334.5
  Bottom Layer w13.23: U2.3 U2.7 ; U2.5 U2.13@-14.14,14.14 ; U2.1 U2.9 ; v3(0,0) U2.8 ; U2.13@14.14,-14.14 U2.11
  other v1: -12.32,-835.61 15.4,-835.61 43.11,-835.61 70.83,-835.61 98.54,-835.61 126.26,-835.61 153.98,-835.61 181.69,-835.61 209.41,-835.61 237.13,-835.61 264.84,-835.61 292.56,-835.61 320.28,-835.61 347.99,-835.61 375.71,-835.77 -40.03,-835.01 403.4,-834.68 430.99,-832 -67.3,-830.06 458.4,-827.88 485.46,-821.88 -92.93,-819.49 512.03,-813.99 538.15,-804.72 -115.73,-803.75 563.7,-793.97 -135.77,-784.59 588.35,-781.3 612.22,-767.22 -155.37,-765 -22.79,-764.39 4.92,-764.39 32.64,-764.39 60.36,-764.39 88.07,-764.39 115.79,-764.39 143.5,-764.39 171.22,-764.39 198.94,-764.39 226.65,-764.39 254.37,-764.39 282.09,-764.39 309.8,-764.39 337.52,-764.39 365.24,-764.39 392.94,-763.6 420.57,-761.4 -50.22,-760.36 447.99,-757.33 635.33,-751.92 474.88,-750.63 -73.77,-745.75 -174.97,-745.4 501.27,-742.16 657.32,-735.04 527.04,-731.95 133.18,-730.19 160.87,-729.09 188.59,-728.8 -194.57,-725.8 -93.43,-726.21 552.08,-720.06 214.48,-718.91 678.08,-716.68 -113.03,-706.61 -214.16,-706.2 575.85,-705.81 237.95,-704.17 697.85,-697.26 598.6,-689.98 -233.76,-686.6 -132.62,-687.01 254.79,-682.15 716.48,-676.73 620.25,-672.67 -253.36,-667 -152.22,-667.41 262.66,-655.58 733.47,-654.84 640.7,-653.97 129.04,-648.87 -171.82,-647.81 -272.92,-647.36 102.82,-640.16 76.16,-632.6 659.32,-633.43 749.19,-632.01 -191.42,-628.22 261.05,-627.91 54.06,-615.87 676.44,-611.64 -211.02,-608.62 763.69,-608.39 249.54,-602.69 39.61,-592.22 692.08,-588.76 -229.25,-587.75 776.49,-583.8 229.94,-583.1 -311.6,-574.69 204.71,-571.62 121.65,-569.39 149.37,-569.39 177.08,-569.39 33.2,-565.25 706.16,-564.89 -241,-562.64 787.56,-558.39 102.91,-548.97 -318.05,-547.73 718.02,-539.83 29.68,-537.76 -242.24,-534.95 797.3,-532.44 100.61,-521.35 -317.81,-520.02 728,-513.97 29.39,-510.05 -247.96,-507.83 805.52,-505.97 100.61,-493.63 -98.97,-488.55 -71.25,-488.55 -43.54,-488.55 -15.82,-488.55 11.9,-488.55 736.24,-487.51 -126.33,-484.09 811.66,-478.95 -150.09,-469.83 96.87,-466.17 742.7,-460.56 816.27,-451.61 -166.49,-447.48 83.07,-442.13 746.77,-433.14 819.44,-424.08 -173.43,-420.65 -76.27,-416.11 -48.55,-416.11 -20.83,-416.11 6.88,-416.11 34.6,-416.11 62.32,-416.11 90.03,-416.11 117.75,-416.11 145.47,-416.11 173.18,-416.11 200.9,-416.11 228.61,-416.11 256.33,-416.11 284.05,-416.11 311.76,-416.11 339.48,-416.11 367.2,-416.11 394.91,-416.11 422.63,-416.11 450.35,-416.11 478.06,-416.11 505.78,-416.11 748.73,-405.5 820.65,-396.39 -169.5,-393.21 749.39,-377.79 -155.58,-369.24 820.61,-368.67 -133.61,-352.35 749.39,-350.07 -106.86,-345.08 -79.15,-344.88 -51.43,-344.88 -23.71,-344.88 4,-344.88 31.72,-344.88 59.43,-344.88 87.15,-344.88 114.87,-344.88 142.58,-344.88 170.3,-344.88 198.02,-344.88 225.73,-344.88 253.45,-344.88 281.17,-344.88 308.88,-344.88 336.6,-344.88 364.32,-344.88 392.03,-344.88 419.75,-344.88 447.47,-344.88 475.18,-344.88 502.9,-344.88 820.28,-340.96 -456.44,-323.09 -413.25,-322.87 744.25,-322.84 -484.04,-320.61 577.15,-321.35 -385.69,-319.87 -511.73,-319.35 -358.49,-314.58 816,-313.57 -538.6,-312.54 41.88,-312.28 -566.07,-308.9 -333.04,-303.6 724.2,-303.69 563.38,-297.3 -587.62,-291.48 -310.37,-287.64 30.88,-286.84 806.7,-287.46 704.41,-284.29 541.6,-280.15 514.9,-272.72 126.87,-272.44 154.59,-272.44 182.31,-272.44 210.02,-272.44 237.74,-272.44 265.45,-272.44 293.17,-272.44 320.89,-272.44 348.6,-272.44 376.32,-272.44 404.04,-272.44 431.75,-272.44 459.47,-272.44 487.19,-272.44 -290.42,-268.4 100.61,-263.57 792.42,-263.71 29.39,-259.16 -493.76,-249.2 -396.42,-249.09 -270.82,-248.81 -466.13,-247.05 -424.05,-246.91 -369.63,-242 -519.58,-239.12 779.64,-239.12 100.61,-235.85 29.39,-231.45 -347.74,-224.99 100.61,-208.13 -328.14,-205.4 29.39,-203.73 -620.94,-202.92 685.07,-196.12 -308.54,-185.8 100.61,-180.42 29.39,-176.01 -288.99,-166.15 100.61,-152.7 29.39,-148.3 231.64,-83.22 -3.01,-75.18 246.86,-60.05 152.11,-44.39 -828.95,-40.19 124.86,-39.31 178.37,-35.51 -911.54,-32.86 -802.19,-32.95 254.62,-33.44 102.12,-23.47 -936.72,-21.29 184.39,-8.46 255.61,-5.74 82.52,-3.87 -956.19,-1.56 -77.58,-1.07 -97.18,18.53 184.39,19.26 255.61,21.97 -967.24,23.85 -895.98,37.52 -116.78,38.13 -868.41,40.39 -813.03,40.19 -840.72,41.39 184.39,46.98 255.61,49.69 -968.52,51.54 -883.84,62.44 -856.19,64.39 -828.47,64.39 -800.76,64.39 -773.04,64.39 -745.32,64.39 -717.61,64.39 -689.89,64.39 -662.17,64.39 -634.46,64.39 -606.74,64.39 -579.03,64.39 -551.31,64.39 -523.59,64.39 -495.88,64.39 -468.16,64.39 -440.44,64.39 -412.73,64.39 -385.01,64.39 -357.29,64.39 -329.58,64.39 -301.86,64.39 -274.14,64.39 -246.43,64.39 -218.71,64.39 -190.99,64.39 -163.28,64.39 184.39,74.69 255.61,77.41 -961.77,78.42 -61.02,83.1 -0.46,91.04 -947.25,102.04 184.39,102.41 -80.62,102.7 255.61,105.12 10,116.71 -926.6,120.51 -101,121.48 729.75,127.65 184.39,130.13 -901.33,131.9 -126.08,133.27 255.61,132.84 648.61,134.67 -874.33,135.64 -846.61,135.61 -818.9,135.61 -791.18,135.61 -763.46,135.61 -735.75,135.61 -708.03,135.61 -680.31,135.61 -652.6,135.61 -624.88,135.61 -597.16,135.61 -569.45,135.61 -541.73,135.61 -514.01,135.61 -486.3,135.61 -458.58,135.61 -430.86,135.61 -403.15,135.61 -375.43,135.61 -347.71,135.61 -320,135.61 -292.28,135.61 -264.57,135.61 -236.85,135.61 -209.13,135.61 -181.42,135.61 -153.7,135.61 -59.15,136.12 18.46,143.1 729.88,155.37 184.39,157.84 255.61,160.55 -50.38,162.41 -358.47,166.12 -331.15,166.09 -476.98,167.32 -212.65,167.35 23.25,170.4 -669.68,174.39 -641.96,174.39 -614.25,174.39 -586.53,174.39 -558.81,174.39 -130.81,174.39 -103.1,174.39 -75.38,174.39 -697.38,175.4 -724.66,180.31 -531.93,181.12 -157.7,181.12 62.16,183.12 89.88,183.12 117.6,183.12 145.31,183.12 173.03,183.12 729.19,183.08 255.34,188.27 -750.87,189.32 -342.48,191.39 -487.69,192.89 -201.95,192.92 -509.45,197.34 -180.18,197.33 17.84,197.58 -775.4,202.21 731.62,210.69 -272.99,213.34 247.94,214.98 658.15,216.62 -797.69,218.69 -344.21,219.05 -489.09,220.57 -194.65,220.97 3.31,221.19 -417.87,229.65 748.24,232.87 230.84,236.79 -817.21,238.36 -18.9,237.78 -272.99,241.05 667.52,242.71 -45.59,245.22 -683.11,245.96 -655.39,245.61 -627.67,245.61 -599.96,245.61 -572.24,245.61 -101.02,245.61 -73.31,245.61 -344.21,246.77 -489.09,248.29 -199.33,248.29 -710.46,250.4 -128.1,251.52 767.83,252.47 68.5,255.57 96.22,255.57 123.94,255.57 151.65,255.57 179.37,255.57 207.09,255.57 234.8,255.57 262.52,255.57 290.23,255.57 317.95,255.57 345.67,255.57 373.38,255.57 401.1,255.57 -417.87,257.36 428.62,258.86 -833.51,260.78 -735.76,261.73 682.28,266.17 -272.99,268.77 -561.54,271.18 452.87,272.29 786.04,273.36 -344.21,274.48 -12.92,275.17 -489.09,276 -199.33,276 -757.68,278.69 -128.1,279.23 -417.87,285.08 701.12,286.49 470.41,293.74 -272.99,296.48 799.38,297.66 -561.54,298.9 -0.02,299.7 -774.28,300.89 -344.21,302.2 -489.09,303.72 -199.33,303.72 720.66,306.15 -128.1,306.95 -417.87,312.8 21.06,317.71 478.3,320.31 -272.99,324.2 807.77,324.08 -785.05,326.43 47.46,326.15 -561.54,326.61 75.16,326.79 102.88,326.79 130.6,326.79 158.31,326.79 186.03,326.79 213.75,326.79 241.46,326.79 269.18,326.79 296.9,326.79 324.61,326.79 352.33,326.79 380.05,326.79 -344.21,329.92 735.3,329.68 -489.09,331.44 -199.33,331.44 -128.1,334.67 21.12,337.25 -859.71,339.01 -417.87,340.51 475.77,347.92 -272.99,351.92 810.78,351.63 -789.19,353.83 -561.54,354.33 0.13,355.35 739.39,357.1 -344.21,357.63 -489.09,359.15 -199.33,359.15 -128.1,362.38 -860.61,366.71 -417.87,368.23 462.76,372.39 810.61,379.35 -272.99,379.63 -12.66,379.94 -789.39,381.55 -344.21,385.35 739.39,384.81 -489.09,386.87 -199.33,386.87 -128.1,390.1 441.61,390.3 -860.45,394.43 -417.87,395.95 248.88,399.23 276.6,399.23 304.32,399.23 332.03,399.23 359.75,399.23 387.47,399.23 415.18,398.63 82.61,400.45 110.33,400.45 138.04,400.45 165.76,400.45 193.47,401.23 -272.99,407.35 810.61,407.06 -14.94,407.56 -788.23,409.24 219.73,410.1 -344.21,413.07 739.39,412.53 -489.09,414.58 -199.33,414.59 -128.1,417.82 -859.19,422.12 -417.87,423.66 240.51,428.43 -6.82,434.06 -272.99,435.07 810.61,434.78 -785.29,436.8 739.39,440.25 -344.21,440.78 -489.09,442.3 -199.33,442.3 -128.1,445.53 -855.7,449.61 -417.87,451.38 253.02,453.17 10.93,455.35 810.2,462.49 -272.99,462.78 -780.54,464.11 -344.21,468.5 738.38,467.94 35.3,468.55 -489.09,470.02 -199.33,470.02 62.84,471.67 90.55,471.67 118.27,471.67 145.99,471.67 173.7,471.67 -128.1,473.25 -850.73,476.88 -417.87,479.1 255.61,480.76 808.19,490.14 -773.8,490.99 -272.99,490.5 735.15,495.47 -344.21,496.22 184.39,497.25 -489.09,497.73 -199.33,497.74 -128.1,500.97 -844.36,503.86 -417.87,506.81 255.61,508.48 -764.66,517.16 -272.99,518.22 804.09,517.55 -561.54,520.63 729.31,522.57 -344.21,523.93 -489.34,525.45 -199.33,525.45 184.39,524.97 -128.1,528.68 -836.02,530.29 255.61,536.19 -753.81,542.66 797.5,544.47 -273.42,545.93 -558.22,548.14 720.93,548.98 -199.33,553.17 184.39,552.68 -825.97,556.12 -128.1,556.4 255.61,563.91 -741.3,567.4 789,570.85 -281.27,572.51 710.07,574.49 184.39,580.4 -814.6,581.39 -130.98,583.97 -727.05,591.17 255.61,591.63 -298.79,593.99 778.68,596.57 696.84,598.84 -262.07,599.86 184.39,608.11 -143.85,608.51 -710.67,613.53 255.61,619.34 -243.7,620.62 681.35,621.83 766.57,621.51 -164.91,626.53 -218.95,633.09 -692.86,634.76 -191.3,635 184.39,635.83 663.75,643.24 752.32,645.28 255.61,647.06 -150.44,648.61 -122.76,649.92 -205.55,653.7 -673.68,654.77 -232.78,658.89 644.2,662.88 184.39,663.55 736.21,667.83 -258.64,668.86 -653.14,673.39 255.65,674.78 622.87,680.58 -282.17,683.5 718.55,689.2 -630.96,690 185.38,691.25 599.95,696.17 -302.42,702.43 261.74,701.82 -607.72,705.11 699.44,709.27 575.66,709.51 191.41,718.3 -583.55,718.66 550.21,720.49 -321.74,722.3 -112.43,723.13 278.59,723.83 -194.6,727.59 678.86,727.84 -166.93,729.19 523.83,728.99 -139.23,730.19 -558.49,730.51 -222.11,730.94 496.76,734.96 303.1,736.77 469.25,738.32 -343.98,738.85 330.69,739.39 358.4,739.39 386.12,739.39 413.84,739.39 441.55,739.39 -532.42,739.93 203.05,743.45 656.69,744.47 -245.35,746.04 -505.79,747.62 -369.11,750.53 -478.71,753.53 -395.94,757.49 -451.3,757.6 -423.62,759.01 633.38,759.46 -649.06,763.64 -264.09,766.47 219.4,765.83 609.06,772.77 -625.05,777.49 239.92,784.46 583.88,784.34 -284.76,784.93 -600.36,790.08 557.78,793.68 263.88,798.4 -574.75,800.69 -307.67,800.53 531.02,800.87 503.81,806.16 290.17,807.17 -548.55,809.73 476.3,809.52 317.66,810.72 345.38,810.61 373.09,810.61 400.81,810.61 428.52,810.61 448.61,810.79 -332.38,813.09 -521.92,817.4 -358.48,822.39 -494.86,823.4 -467.42,827.31 -385.57,828.29 -439.82,829.79 -413.17,830.82
  other v2: -151.1,-910.27 -72.36,-910.27 6.38,-910.27 85.12,-910.27 163.86,-910.27 242.6,-910.27 321.34,-910.27 -505.43,-831.53 -426.69,-831.53 -347.95,-831.53 -190.47,-831.53 -623.54,-752.79 -544.8,-752.79 -466.06,-752.79 -387.32,-752.79 -308.58,-752.79 -229.84,-752.79 -662.91,-674.05 -545,-650 -475,-650 -405,-650 -335,-650 335,-650 405,-650 475,-650 545,-650 -600,-600 600,-600 -781.02,-595.31 -702.28,-595.31 -151.1,-595.31 -72.36,-595.31 6.38,-595.31 -460,-590 -405,-590 405,-590 460,-590 -650,-545 650,-545 -820.39,-516.57 -741.65,-516.57 -505.43,-516.57 -347.95,-516.57 -190.47,-516.57 -111.73,-516.57 -32.99,-516.57 203.23,-516.57 281.97,-516.57 360.71,-516.57 518.19,-516.57 833.15,-516.57 -650,-475 650,-475 -590,-460 590,-460 -859.76,-437.83 -781.02,-437.83 -702.28,-437.83 -466.06,-437.83 -387.32,-437.83 715.04,-437.83 872.52,-437.83 -650,-405 -590,-405 590,-405 650,-405 -899.13,-359.09 -820.39,-359.09 -741.65,-359.09 -505.43,-359.09 -426.69,-359.09 -190.47,-359.09 911.89,-359.09 -650,-335 650,-335 -938.5,-280.35 -859.76,-280.35 -781.02,-280.35 -72.36,-280.35 -649.61,-248.03 649.61,-248.03 -705.28,-224.97 593.93,-224.97 -899.13,-201.61 -820.39,-201.61 -505.43,-201.61 -426.69,-201.61 -32.99,-201.61 203.23,-201.61 360.71,-201.61 833.15,-201.61 911.89,-201.61 -728.35,-169.29 -570.87,-169.29 570.87,-169.29 728.35,-169.29 -938.5,-122.87 -859.76,-122.87 -781.02,-122.87 -466.06,-122.87 -387.32,-122.87 -308.58,-122.87 400.08,-122.87 478.82,-122.87 793.78,-122.87 872.52,-122.87 951.26,-122.87 -705.28,-113.61 -593.93,-113.61 593.93,-113.61 705.28,-113.61 -649.61,-90.55 649.61,-90.55 -977.87,-44.13 -584.17,-44.13 -505.43,-44.13 -426.69,-44.13 -347.95,-44.13 -269.21,-44.13 281.97,-44.13 439.45,-44.13 518.19,-44.13 596.93,-44.13 833.15,-44.13 911.89,-44.13 -544.8,34.61 -466.06,34.61 -387.32,34.61 -308.58,34.61 -229.84,34.61 -151.1,34.61 85.12,34.61 321.34,34.61 400.08,34.61 478.82,34.61 557.56,34.61 793.78,34.61 872.52,34.61 951.26,34.61 -977.87,113.35 45.75,113.35 124.49,113.35 360.71,113.35 439.45,113.35 518.19,113.35 596.93,113.35 754.41,113.35 833.15,113.35 911.89,113.35 -938.5,192.09 -859.76,192.09 321.34,192.09 400.08,192.09 478.82,192.09 557.56,192.09 793.78,192.09 872.52,192.09 951.26,192.09 518.19,270.83 596.93,270.83 833.15,270.83 911.89,270.83 -650,335 650,335 -702.28,349.57 -72.36,349.57 557.56,349.57 872.52,349.57 -650,405 -590,405 590,405 650,405 -741.65,428.31 281.97,428.31 360.71,428.31 439.45,428.31 -590,460 590,460 -650,475 650,475 -702.28,507.05 -72.36,507.05 6.38,507.05 85.12,507.05 321.34,507.05 400.08,507.05 478.82,507.05 -650,545 650,545 -32.99,585.79 45.75,585.79 124.49,585.79 -460,590 -405,590 405,590 460,590 -600,600 600,600 -545,650 -475,650 -405,650 -335,650 335,650 405,650 475,650 545,650 85.12,664.53 124.49,743.27 -229.84,822.01 -151.1,822.01 -72.36,822.01 6.38,822.01 85.12,822.01 163.86,822.01 242.6,822.01 -347.95,900.75 -269.21,900.75 -190.47,900.75 -111.73,900.75 -32.99,900.75 45.75,900.75 124.49,900.75 203.23,900.75 281.97,900.75 360.71,900.75
  other v3: -259.07,-415.16 -181.94,-207.69 -225.79,-163.85 -138.1,-163.85 -181.94,-120
GNSS: C1.2 J2.1 | length 1594.8
  Bottom Layer w13.39: C1.2 -280.33,-538.26 ccw(c-156.21,-538.26) -244.08,-625.92 -243.98,-626.02 -99.17,-770.83 -99.09,-770.91 ccw(c-28.71,-700.32) -28.71,-800 -28.58,-800 -13.58,-800 374.8,-800 ccw(c375.36,-390.45) 665,-680 ccw(c375.64,-390.44) 785,-390.09 785,-389.96 785,-350.41 785,-349.11 ccw(c677.67,-349.14) 753.56,-273.25 747.88,-267.56 J2.1
LTE: C6.1 J1.1 | length 125.5
  Bottom Layer w13.39: J1.1 -563.19,-255.71 ccw(c-492.48,-185) -492.48,-285 C6.1@-458.43,-285
NetANT1_2: ANT1.2 C15.2 L4.1 | length 110.6
  Bottom Layer w13.39: C15.2 L4.1 v3(-689.4,0.6)
NetANT1_4: ANT1.4 C13.2 L3.1 | length 110.6
  Bottom Layer w13.39: C13.2 L3.1 v3(0.6,689.4)
NetANT1_6: ANT1.6 C11.2 L2.1 | length 110.6
  Bottom Layer w13.39: v3(689.4,-0.6) L2.1 C11.2@689.4,110
NetANT1_8: ANT1.8 C9.2 L1.1 | length 110.6
  Bottom Layer w13.39: v3(-0.6,-689.4) L1.1 C9.2
NetC1_1: C1.1 U1.6 | length 49.7
  Bottom Layer w13.39: C1.1 U1.6
NetC4_1: C4.1 U1.3 | length 39
  Bottom Layer w13.39: U1.3 C4.1
NetC4_2: C4.2 U3.9 | length 71.2
  Bottom Layer w13.39: C4.2 cw(c-152.21,-309.14) U3.9
NetC5_1: C5.1 U3.3 | length 48
  Bottom Layer w13.23: U3.3 C5.1
NetC5_2: C5.2 U2.2 | length 38.4
  Bottom Layer w13.23: C5.2 U2.2
NetC6_2: C6.2 U3.12 | length 201.2
  Bottom Layer w13.39: C6.2 -398.8,-285 ccw(c-398.8,-185) -328.09,-255.71 U3.12 U3.12@-263.78,-191.78
SW: J3.2 R1.2 U3.2 | length 721.6
  Top Layer w13.23: v3(-147.22,-22.81) -72.32,-97.71 ccw(c-44.3,-69.59) -44.37,-109.29 v3(354.33,-109.29)
  Bottom Layer w13.23: v3(-147.22,-22.81) -126.86,-43.17 cw(c-148.69,-65) -117.82,-65 cw(c-157.97,-65) -129.58,-93.39 U3.2 ; v3(354.33,-109.29) R1.2
Vdd: C2.1 C3.1 C7.1 J3.1 U1.1 U1.2 U3.1 U3.5 | length 249.7
  Top Layer w13.23: v3@-74.23,-162.74 v3(-73.11,-163.85)
  Bottom Layer w13.23: C2.1 C3.1 v3(-311.57,-375) U1.1 U1.2 ; v3(-181.15,-56.73) U3.1@-157.55,-80.33 ; v3(-73.11,-163.85) -96.71,-187.45 cw(c-101.9,-182.25) U3.5 C7.1
  other v3: 432.96,-228.11 433.07,-201.73 433.07,-173.67
pads on no net: J1. J2. U1.4 U1.5 U3.4 U3.6 U3.7 U3.8 U3.10 U3.11 U3.13 U3.14 U3.15 U3.16

## Polygon pours and split planes (outlines as drawn)
GND on Bottom Layer "GND_L04_P000" (solid, remove dead copper, pour order 0): -1023.62,1023.62 1023.62,1023.62 1023.62,-1023.62 -1023.62,-1023.62
GND on Top Layer "GND_L01_P001" (solid, remove dead copper, pour order 1): -1023.62,1023.62 1023.62,1023.62 1023.62,-1023.62 -1023.62,-1023.62
GND on Mid Layer 2 (split plane): 233 vertices, not listed, extent -1003.61,-1003.61 1003.61,1003.61
Vdd on Mid Layer 1 (split plane): 233 vertices, not listed, extent -1003.61,-1003.61 1003.61,1003.61

## Keep-outs
Keep-Out Layer:
  circle w10: c0,0 r1023.62

## Other copper
Top Layer:
  region net GND: 303.9,676.9 300.6,675.7 297.6,673.8 295.1,671.3 293.2,668.3 292.1,665 291.7,661.5 291.7,626.1 292.5,623 294,620.1 296.1,617.7 298.6,615.7 301.5,614.3 413.7,541.4 420.4,538 427.7,535.8 435.2,535 442.7,535.6 450,537.6 456.8,540.9 462.9,545.4 498.4,576.9 508.1,580.4 518.2,582.2 528.6,582.2 538.7,580.4 548.4,576.9 557.4,571.7 565.3,565.1 571.9,557.2 577.1,548.2 580.6,538.5 582.4,528.3 582.4,518 580.6,507.8 577.1,498.1 545.6,462.7 541.1,456.6 537.7,449.8 535.7,442.5 535.1,435 536,427.4 538.2,420.2 541.7,413.5 614.5,301.3 616.5,297.8 619.2,295 622.6,292.8 626.3,291.4 661.7,291.4 665.2,291.8 668.6,293 671.6,294.9 674.1,297.4 675.9,300.3 677.1,303.7 677.5,307.2 677.5,533.6 676,554 671.7,574 664.5,593.3 654.7,611.2 642.4,627.7 627.9,642.2 611.5,654.4 593.5,664.3 574.3,671.4 554.2,675.8 533.8,677.3 307.4,677.3
  region net GND: 676.9,-303.9 675.7,-300.6 673.8,-297.6 671.3,-295.1 668.3,-293.2 665,-292.1 661.5,-291.7 626.1,-291.7 623,-292.5 620.1,-294 617.7,-296.1 615.7,-298.6 614.3,-301.5 541.4,-413.7 538,-420.4 535.8,-427.7 535,-435.2 535.6,-442.7 537.6,-450 540.9,-456.8 545.4,-462.9 576.9,-498.4 580.4,-508.1 582.2,-518.2 582.2,-528.6 580.4,-538.7 576.9,-548.4 571.7,-557.4 565.1,-565.3 557.2,-571.9 548.2,-577.1 538.5,-580.6 528.3,-582.4 518,-582.4 507.8,-580.6 498.1,-577.1 462.7,-545.6 456.6,-541.1 449.8,-537.7 442.5,-535.7 435,-535.1 427.4,-536 420.2,-538.2 413.5,-541.7 301.3,-614.5 297.8,-616.5 295,-619.2 292.8,-622.6 291.4,-626.3 291.4,-661.7 291.8,-665.2 293,-668.6 294.9,-671.6 297.4,-674.1 300.3,-675.9 303.7,-677.1 307.2,-677.5 533.6,-677.5 554,-676 574,-671.7 593.3,-664.5 611.2,-654.7 627.7,-642.4 642.2,-627.9 654.4,-611.5 664.3,-593.5 671.4,-574.3 675.8,-554.2 677.3,-533.8 677.3,-307.4
  region net GND: -676.9,303.9 -675.7,300.6 -673.8,297.6 -671.3,295.1 -668.3,293.2 -665,292.1 -661.5,291.7 -626.1,291.7 -623,292.5 -620.1,294 -617.7,296.1 -615.7,298.6 -614.3,301.5 -541.4,413.7 -538,420.4 -535.8,427.7 -535,435.2 -535.6,442.7 -537.6,450 -540.9,456.8 -545.4,462.9 -576.9,498.4 -580.4,508.1 -582.2,518.2 -582.2,528.6 -580.4,538.7 -576.9,548.4 -571.7,557.4 -565.1,565.3 -557.2,571.9 -548.2,577.1 -538.5,580.6 -528.3,582.4 -518,582.4 -507.8,580.6 -498.1,577.1 -462.7,545.6 -456.6,541.1 -449.8,537.7 -442.5,535.7 -435,535.1 -427.4,536 -420.2,538.2 -413.5,541.7 -301.3,614.5 -297.8,616.5 -295,619.2 -292.8,622.6 -291.4,626.3 -291.4,661.7 -291.8,665.2 -293,668.6 -294.9,671.6 -297.4,674.1 -300.3,675.9 -303.7,677.1 -307.2,677.5 -533.6,677.5 -554,676 -574,671.7 -593.3,664.5 -611.2,654.7 -627.7,642.4 -642.2,627.9 -654.4,611.5 -664.3,593.5 -671.4,574.3 -675.8,554.2 -677.3,533.8 -677.3,307.4
  region net GND: -303.9,-676.9 -300.6,-675.7 -297.6,-673.8 -295.1,-671.3 -293.2,-668.3 -292.1,-665 -291.7,-661.5 -291.7,-626.1 -292.5,-623 -294,-620.1 -296.1,-617.7 -298.6,-615.7 -301.5,-614.3 -413.7,-541.4 -420.4,-538 -427.7,-535.8 -435.2,-535 -442.7,-535.6 -450,-537.6 -456.8,-540.9 -462.9,-545.4 -498.4,-576.9 -508.1,-580.4 -518.2,-582.2 -528.6,-582.2 -538.7,-580.4 -548.4,-576.9 -557.4,-571.7 -565.3,-565.1 -571.9,-557.2 -577.1,-548.2 -580.6,-538.5 -582.4,-528.3 -582.4,-518 -580.6,-507.8 -577.1,-498.1 -545.6,-462.7 -541.1,-456.6 -537.7,-449.8 -535.7,-442.5 -535.1,-435 -536,-427.4 -538.2,-420.2 -541.7,-413.5 -614.5,-301.3 -616.5,-297.8 -619.2,-295 -622.6,-292.8 -626.3,-291.4 -661.7,-291.4 -665.2,-291.8 -668.6,-293 -671.6,-294.9 -674.1,-297.4 -675.9,-300.3 -677.1,-303.7 -677.5,-307.2 -677.5,-533.6 -676,-554 -671.7,-574 -664.5,-593.3 -654.7,-611.2 -642.4,-627.7 -627.9,-642.2 -611.5,-654.4 -593.5,-664.3 -574.3,-671.4 -554.2,-675.8 -533.8,-677.3 -307.4,-677.3
Bottom Layer:
  region net GND: -649.61,-314.05 -597.41,-261.86 -636.44,-222.83 -645.68,-224.27 -655.23,-224.13 -664.61,-222.32 -673.55,-218.96 -681.73,-214.06 -689,-207.85 -695.04,-200.47 -699.77,-192.17 -702.95,-183.21 -704.53,-173.77 -704.5,-164.22 -702.81,-154.84 -699.52,-145.88 -694.73,-137.64 -688.58,-130.32 -681.26,-124.16 -673.02,-119.38 -664.05,-116.09 -654.67,-114.39 -645.12,-114.37 -635.69,-115.95 -626.72,-119.13 -618.43,-123.86 -611.05,-129.9 -604.84,-137.17 -599.94,-145.35 -596.57,-154.29 -594.76,-163.67 -594.62,-173.22 -596.07,-182.46 -557.04,-221.49 -504.84,-169.29 -649.61,-24.53 -794.37,-169.29
  region net GND: 649.61,-314.05 701.8,-261.86 662.77,-222.83 653.53,-224.27 643.98,-224.13 634.6,-222.32 625.66,-218.96 617.48,-214.06 610.21,-207.85 604.17,-200.47 599.44,-192.17 596.27,-183.21 594.68,-173.77 594.71,-164.22 596.41,-154.84 599.69,-145.88 604.48,-137.64 610.63,-130.32 617.95,-124.16 626.19,-119.38 635.16,-116.09 644.54,-114.39 654.09,-114.37 663.53,-115.95 672.49,-119.13 680.79,-123.86 688.16,-129.9 694.37,-137.17 699.27,-145.35 702.64,-154.29 704.45,-163.67 704.59,-173.22 703.14,-182.46 742.17,-221.49 794.37,-169.29 649.61,-24.53 504.84,-169.29

## Silkscreen, mask and mechanical layers (free items; w line width, h text height)
Top Overlay:
  text "PiggySat" at -116.47,920 h30
  text "LTE/GNSS combo antenna" at -330.69,840 h30
  text "90" at -50,760 h60
  text "0" at -815,-30 h60
  text "180" at 770,-30 h60
  text "270" at -75,-825 h60
Bottom Overlay:
  text "GNSS" at 750,-14.14 h60 r135
  text "LTE" at -735,-350.86 h60 r315
Assembly Notes:
  drawing of 296 lines, arcs and shapes, not listed
  text "Layer" at 1195.17,950 h30
  text "Name" at 1410.13,950 h30
  text "Material" at 1885,950 h30
  text "Thickness" at 2324.88,950 h30
  text "Constant" at 2659.8,950 h30
  text "Board Layer Stack" at 2954.73,950 h30
  text "Top Overlay" at 1410.13,890 h30
  text "Top Solder" at 1410.13,830 h30
  text "Solder Resist" at 1885,830 h30
  text "0.50mil" at 2324.88,830 h30
  text "3.8" at 2659.8,830 h30
  text "1" at 1195.17,770 h30
  text "Top Layer" at 1410.13,770 h30
  text "1.38mil" at 2324.88,770 h30
  text "Dielectric 1" at 1410.13,710 h30
  text "7628" at 1885,710 h30
  text "8.28mil" at 2324.88,710 h30
  text "4.4" at 2659.8,710 h30
  text "2" at 1195.17,650 h30
  text "Mid Layer 1" at 1410.13,650 h30
  text "0.60mil" at 2324.88,650 h30
  text "Core" at 1410.13,590 h30
  text "FR-4" at 1885,590 h30
  text "41.93mil" at 2324.88,590 h30
  text "4.6" at 2659.8,590 h30
  text "3" at 1195.17,530 h30
  text "Mid Layer 2" at 1410.13,530 h30
  text "0.60mil" at 2324.88,530 h30
  text "Dielectric 2" at 1410.13,470 h30
  text "7628" at 1885,470 h30
  text "8.28mil" at 2324.88,470 h30
  text "4.4" at 2659.8,470 h30
  text "4" at 1195.17,410 h30
  text "Bottom Layer" at 1410.13,410 h30
  text "1.38mil" at 2324.88,410 h30
  text "Bottom Solder" at 1410.13,350 h30
  text "Solder Resist" at 1885,350 h30
  text "0.50mil" at 2324.88,350 h30
  text "3.8" at 2659.8,350 h30
  text "Bottom Overlay" at 1410.13,290 h30

## Dimensions
-1010,-169.29 to 1010,-169.29 on Assembly Notes
0,0 to -845.91,845.91 on Assembly Notes

## Text inside footprints (layer, text, board x,y; h text height)
J3: Bottom Overlay "1" at 444.33,-86.73 h30; Bottom Overlay "3" at 289.33,-86.73 h30